# Altium PCB Sound_Board.PcbDoc
Units mil, origin at the board's own origin, x right, y up, seen from the top; angles counter-clockwise.
Board outline 1333.45 x 1141 mil, 2 copper layers (Top Layer, Bottom Layer), stack 57 mil thick; 6 components, 7 nets, 30 pads, 5 vias.
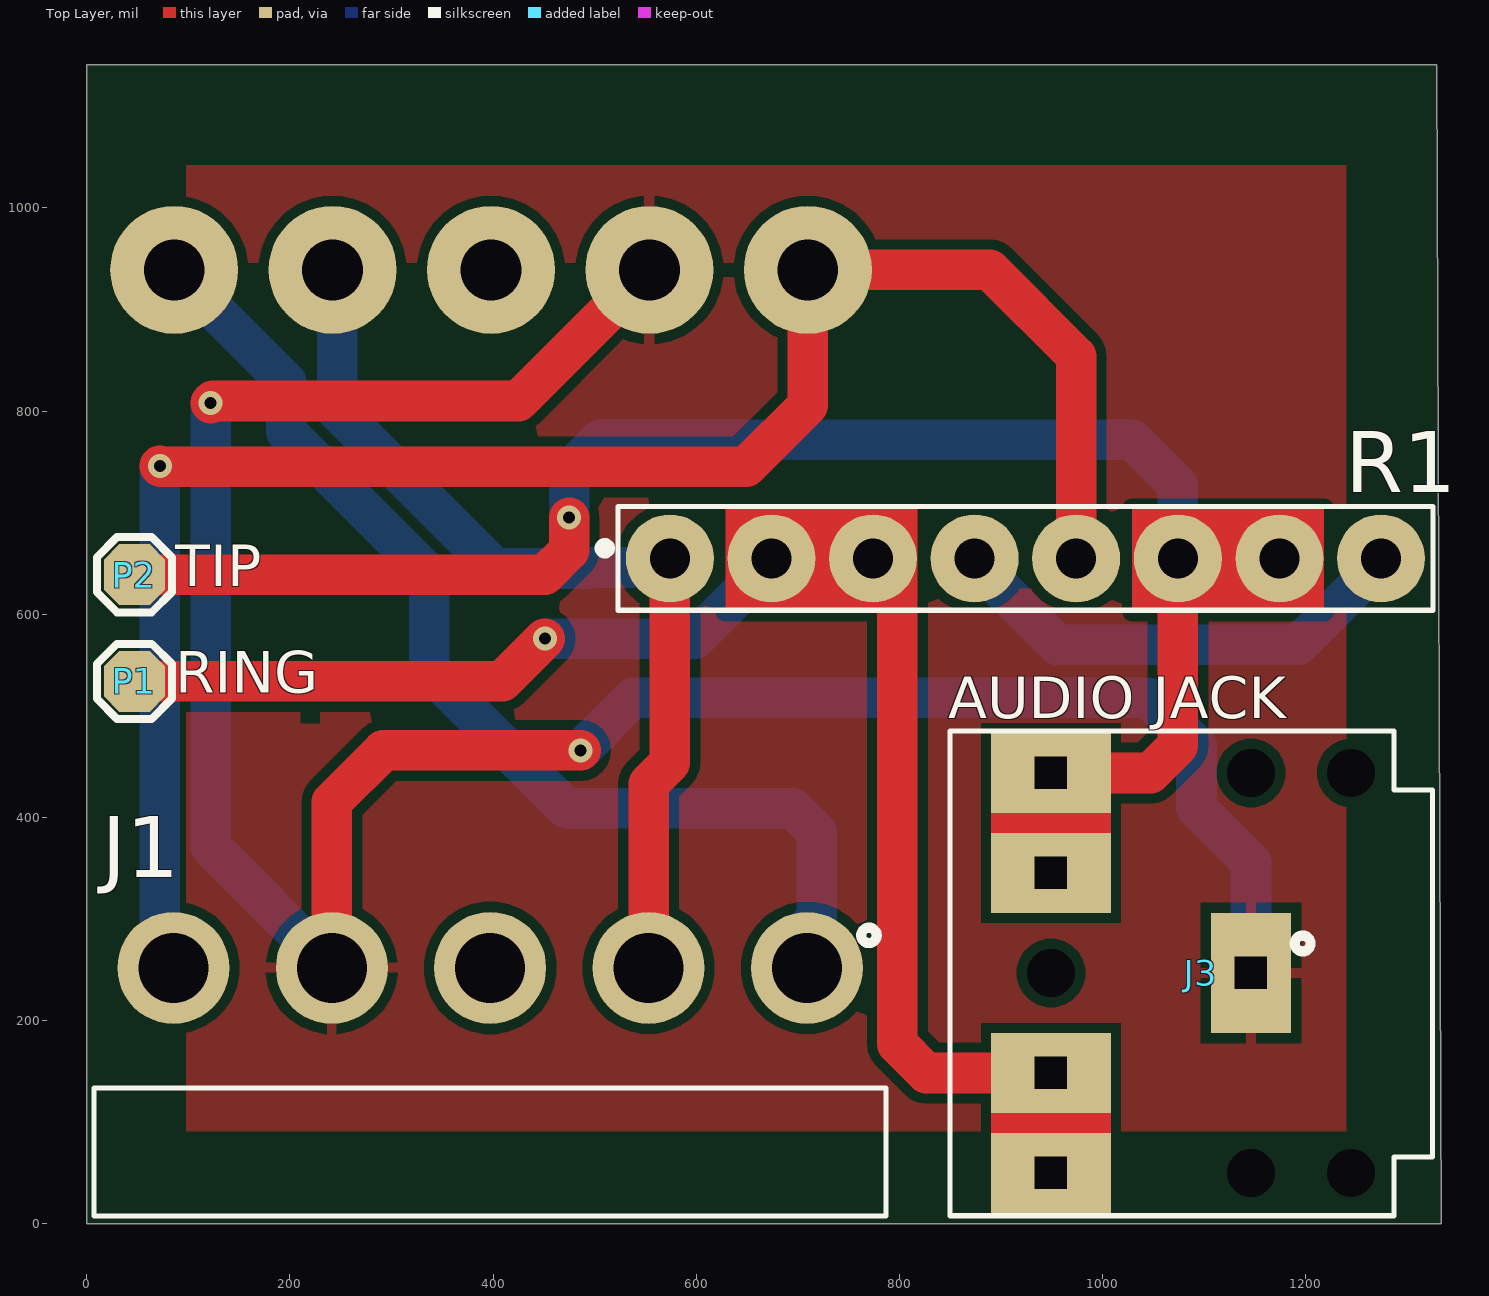
[diagram p0: Top Layer view]
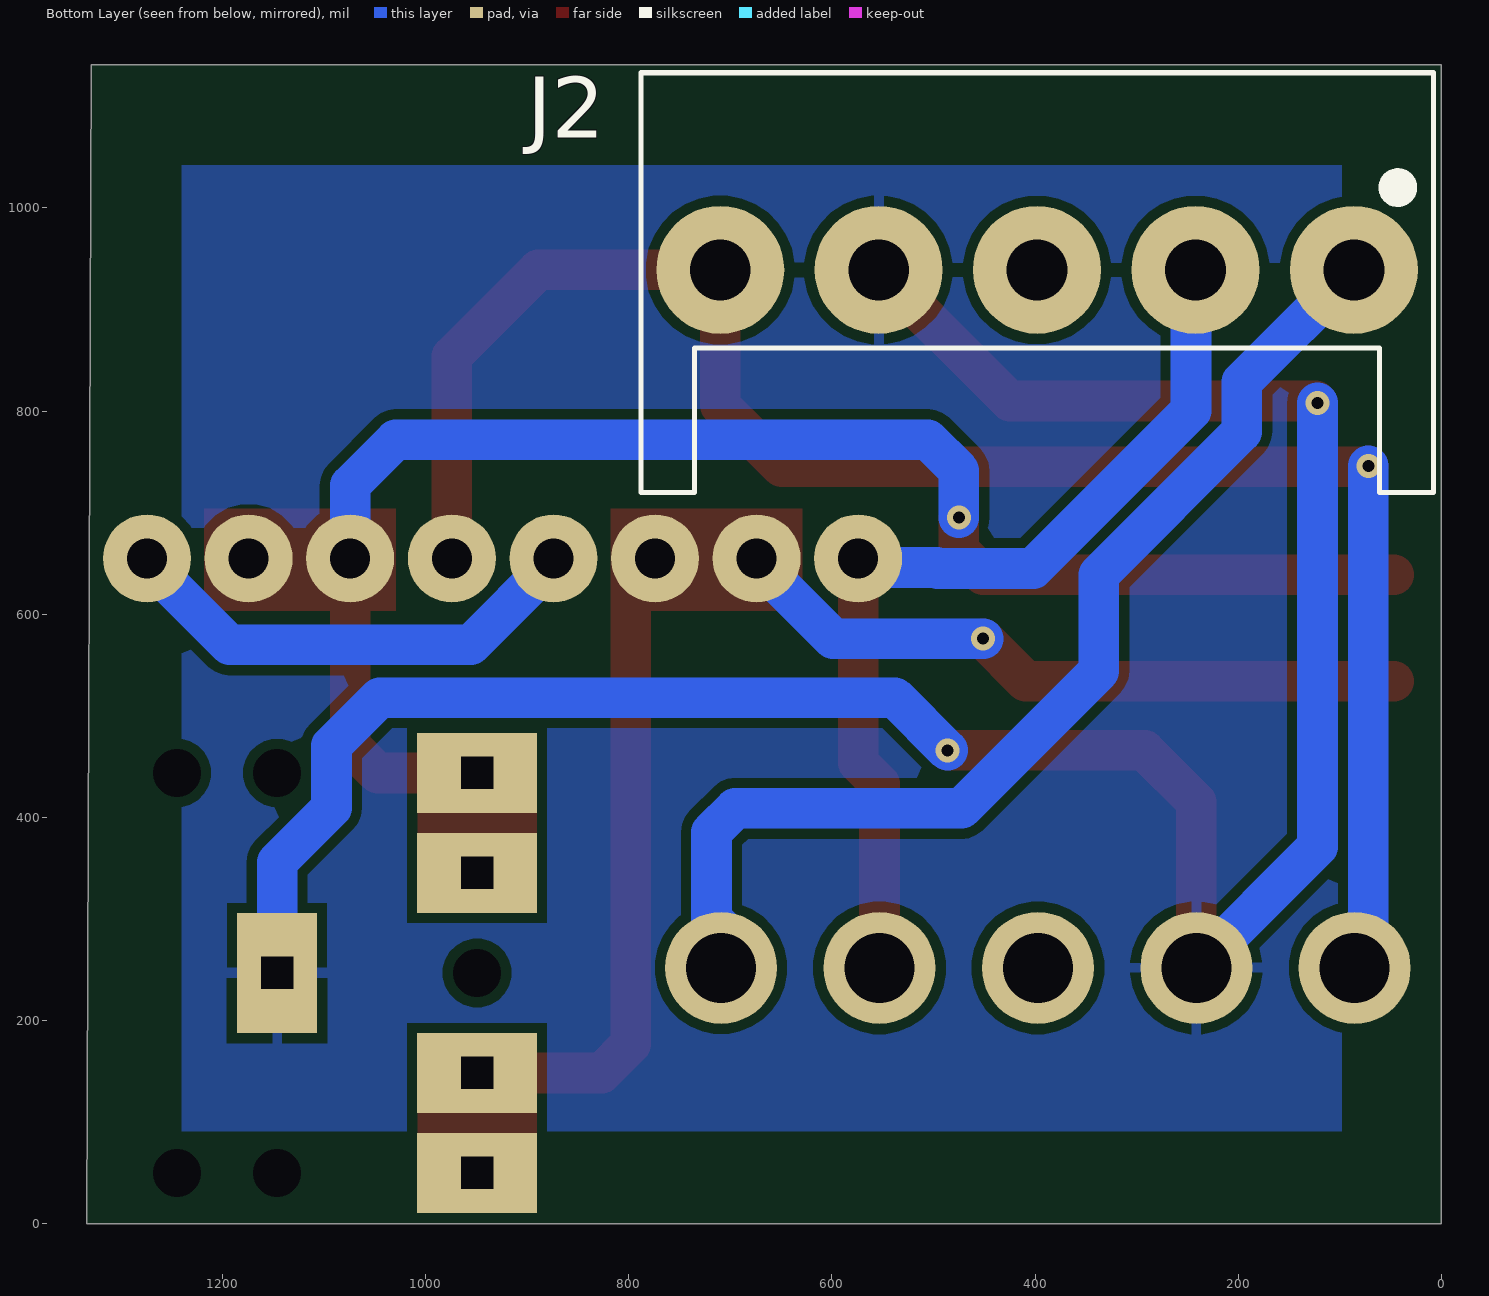
[diagram p1: Bottom Layer view, seen from below]

## Layer stack, top to bottom
Top Solder: solder mask 3, Solder Resist, Dk 3.5
Top Layer: signal copper 10
Dielectric 1: dielectric 37, FR-4, Dk 4.8
Bottom Layer: signal copper 10
Bottom Solder: solder mask 3, Solder Resist, Dk 3.5

## Board outline
0,0 0,1141 1329.09,1141 1333.45,0

## Design rules (kind name [scope] priority, off if disabled: settings)
Clearance [All] p1: gap=10 ignorepadtopadclearanceinfootprint=FALSE except(0: Arc-Hole Track-Hole SMDPad-Hole THPad-Hole Via-Hole Fill-Hole Poly-Hole Region-Hole Text-Hole)
HoleToHoleClearance [All] p1: gap=0 allowstackedmicrovias=TRUE
MinimumSolderMaskSliver [All] p1: minsoldermaskwidth=0
PolygonConnect [All] p1: connectstyle=Relief reliefconductorwidth=10 reliefentries=4 polygonreliefangle="90 Angle" airgapwidth=10
RoutingVias [All] p1: holewidth=11.81 width=23.62 viastyle="Through Hole" minholewidth=11.81 minwidth=23.62 maxholewidth=11.81 maxwidth=23.62
SilkToSilkClearance [All] p1: silktosilkclearance=0
SilkToSolderMaskClearance [IsPad] p1: minsilkscreentomaskgap=0 clearancetoexposedcopper=TRUE
SolderMaskExpansion [All] p1: expansion=4 istentingtop=FALSE
Width [All] p1: maxlimit=40 minlimit=10 preferedwidth=22
26 further rules are at their usual default settings.

## Components (designator, comment, footprint, x,y, rotation, side; value= is the part's Value field where it differs from the comment)
J1 "M3960R-05P" M3960R-05P 709,252 r180 top
J2 "0009484058" 0009484058 398,939 r0 bottom
J3 "PJ-307C" PJ-307C 1096.79,247 r180 top
P1 "Test Point" "TEST POINT" 47,534 r180 top
P2 "Test Point" "TEST POINT" 47,639 r0 top
R1 "220R" 4608X-102-221LF 924,655 r0 top

## Footprints (in the part's own frame and the unit in brackets; to place one, negate y for a bottom-side part, rotate by r counter-clockwise, add the part's x,y. Pads: shape width x height; smd on the part's side, far side on the other; paste and mask are expansions set on the pad)
4608X-102-221LF [mm]
  round 2.2 hole 1: 1(-8.89,0) 2(-6.35,0) 3(-3.81,0) 4(-1.27,0) 5(1.27,0) 6(3.81,0) 7(6.35,0) 8(8.89,0)
  silkscreen extent -10.64,-1.3 10.19,1.3, body extent -10.14,-1.24 10.14,1.25, height 4.35
0009484058 [mm]
  round 3.2 hole 1.52: 1(-7.92,0) 2(-3.96,0) 3(0,0) 4(3.96,0) 5(7.92,0)
  silkscreen extent -9.91,-4.93 9.91,5.56, body extent -9.86,-6.35 9.86,5.53, height 11.5
M3960R-05P [mm]
  round 2.8 hole 1.75: 1(0,0) 2(3.96,0) 3(7.92,0) 4(11.88,0) 5(15.84,0)
  silkscreen extent -1.98,-1.01 17.82,6.2
PJ-307C [mm]
  rect 2x3 hole 0.8 square: 1(-1.25,0)
  rect 3x2 hole 0.8 square: 2(3.75,5) 3(3.75,2.5) 4(3.75,-2.5) 5(3.75,-5)
  round 0 hole 1.2 unplated: MH1(-3.75,5) MH2(-1.25,5) MH3(-3.75,-5) MH4(-1.25,-5) MH5(3.75,0)
  silkscreen extent -5.79,-6.05 6.27,6.07, body extent -7.76,-5.98 6.24,6.02, height 6.01
"TEST POINT" [mil]
  oct 60x60 smd: 1(0,0)
  silkscreen extent -37,-37 37,37

## Part data
J1: "1x5P 1 3.96mm Male pin 5 Shrouded Plugin,P=3.96mm Wire To Board / Wire To Wire Connector ROHS", Manufacturer=XFCN, ComponentLink1Description=LCSC, ComponentLink1URL=https://www.lcsc.com/product-detail/Wire-To-Board-Wire-To-Wire-Connector_XFCN-M3960R-05P_C492523.html, Manufacturer Part No=M3960R-05P
J2: "CONN RCPT 5POS 0.156 TIN PCB", Manufacturer=Molex, Manufacturer Part Number=09-48-4058, Supplier Part Number 1=99AC9867, Category="Headers and Wire Housings", ComponentLink1Description=https://datasheet.ciiva.com/5152/0009484058-pcb-receptacles-156345-5152334.pdf?src-supplier=Mouser, ComponentLink1URL=https://datasheet.ciiva.com/5152/0009484058-pcb-receptacles-156345-5152334.pdf?src-supplier=Mouser, ComponentLink2Description=https://datasheet.ciiva.com/30162/135130009484058-pcb-receptacles-30162639.pdf?src-supplier=Onlinecomponents.com, ComponentLink2URL=https://datasheet.ciiva.com/30162/135130009484058-pcb-receptacles-30162639.pdf?src-supplier=Onlinecomponents.com, ComponentLink3Description=https://datasheet.ciiva.com/3935/54480009484058-pcb-receptacles-3935610.pdf?src-supplier=Arrow+Electronics, ComponentLink3URL=https://datasheet.ciiva.com/3935/54480009484058-pcb-receptacles-3935610.pdf?src-supplier=Arrow+Electronics, ComponentLink4Description=https://datasheet.ciiva.com/23692/ps-08-50-23692432.pdf?src-supplier=Newark, ComponentLink4URL=https://datasheet.ciiva.com/23692/ps-08-50-23692432.pdf?src-supplier=Newark, Pricing 1="1=1.40000, 10=1.14000, 25=1.08000, 50=1.02000, 100=0.95900, 250=0.91000 (USD)", RoHS=Yes, Stock 1=536, Supplier 1=Newark
J3: "3.5mm headphone jack 30V 500mA Plugin Audio Connectors ROHS", Manufacturer=BOOMELE, Package=Custom, ComponentLink1Description=LCSC, ComponentLink1URL=https://www.lcsc.com/product-detail/span-style-background-color-ff0-Audio-span-Connectors_BOOMELE-Boom-Precision-Elec-PJ-307C_C16684.html, Manufacturer Part No=PJ-307C
P1 P2: library part "TEST POINT", "Test Point ON"
R1: library part 4608X-102-221LF, "RES ARRAY 4 RES 220 OHM 8SIP", Case/Package=SIP, Insulation Resistance=10GR, Manufacturer=Bourns, Max Operating Temperature=125°C, Min Operating Temperature=-55°C, Number of Resistors=4, Package Quantity=200, Power Per Element=300mW, Power Rating=1W, Resistance Tolerance=2%, Supplier Part Number 1=5223882, Temperature Coefficient=100ppm/°C, Voltage Rating=100V, Category="Resistor Arrays", Circuit Type=Isolated, ComponentLink1Description=https://datasheet.ciiva.com/14179/ee4609x-14179600.pdf?src-supplier=Distrelec, ComponentLink1URL=https://datasheet.ciiva.com/14179/ee4609x-14179600.pdf?src-supplier=Distrelec, ComponentLink2Description=https://datasheet.ciiva.com/11807/0900766b8069ccfd-11807176.pdf?src-supplier=RSComponents, ComponentLink2URL=https://datasheet.ciiva.com/11807/0900766b8069ccfd-11807176.pdf?src-supplier=RSComponents, ComponentLink3Description=https://datasheet.ciiva.com/3263/4600x-3263657.pdf?src-supplier=Avnet, ComponentLink3URL=https://datasheet.ciiva.com/3263/4600x-3263657.pdf?src-supplier=Avnet, ComponentLink4Description=https://datasheet.ciiva.com/15158/getdatasheetpartid-201762-15158038.pdf?src-supplier=Verical, ComponentLink4URL=https://datasheet.ciiva.com/15158/getdatasheetpartid-201762-15158038.pdf?src-supplier=Verical, ComponentLink5Description=https://datasheet.ciiva.com/16827/4600x-16827721.pdf?src-supplier=Avnet+Europe, ComponentLink5URL=https://datasheet.ciiva.com/16827/4600x-16827721.pdf?src-supplier=Avnet+Europe, ComponentLink6Description=https://datasheet.ciiva.com/2690/4600x-2690298.pdf?src-supplier=Digi-Key, ComponentLink6URL=https://datasheet.ciiva.com/2690/4600x-2690298.pdf?src-supplier=Digi-Key, ComponentLink7Description=https://datasheet.ciiva.com/30208/4600x-30208038.pdf?src-supplier=Onlinecomponents.com, ComponentLink7URL=https://datasheet.ciiva.com/30208/4600x-30208038.pdf?src-supplier=Onlinecomponents.com, ComponentLink8Description=https://datasheet.ciiva.com/14583/70154307-14583677.pdf?src-supplier=Allied+Electronics, ComponentLink8URL=https://datasheet.ciiva.com/14583/70154307-14583677.pdf?src-supplier=Allied+Electronics, ComponentLink9Description=https://datasheet.ciiva.com/1133/682196-1133120.pdf?src-supplier=Element14, ComponentLink9URL=https://datasheet.ciiva.com/1133/682196-1133120.pdf?src-supplier=Element14, Depth=2.49mm, Height=0.2inch, Lead Free="Lead Free", Lead Length=3.43mm, Length=20.27mm, Manufacturer Part Number=4608X-102-221LF, Material=Resin,Epoxy, Military Standard=Not, Mount="Through Hole", Number of Contacts=8, Number of Elements=4, Number of Pins=8, Number of Terminals/Pins=8, Packaging=Bulk, Pricing 1="25=0.31900, 625=0.15300, 1250=0.13900, 2500=0.13200 (USD)", Radiation Hardening=No, REACH SVHC="No SVHC", Resistance=220R, RoHS=Yes, RoHS Compliant=Yes, Series=4600X, Stock 1=1, Supplier 1=RSComponents, Technology="THICK FILM", Terminal Pitch=2.54mm, Termination=Pin, Thickness=0.096inch, Tolerance=2%, Voltage Rating (DC)=100V, Width=0.098inch

## Via types
v1: diameter 23.62, hole 11.81, Top Layer to Bottom Layer, tented both sides, 5 vias

## Nets (pads, with @x,y where several pads share a name; then routed paths per layer and width w, separated by ;. In a path a pad name is that pad's centre, name@x,y a point inside that pad or via, vN(x,y) a via of type N, cw(c..) or ccw(c..) an arc to the next point about the centre after c; other vN are vias at no path point)
L+: J1.5 J2.5 R1.5 | length 1794.5
  Top Layer w40: v1(72,746) 72.92,745.08 649.08,745.08 709.81,805.81 J2.5 889,939 974,854 R1.5
  Bottom Layer w40: v1(72,746) 72,265.38 J1.5
L-: J1.4 J2.4 J3.1 | length 2414
  Top Layer w40: v1(122,808) 124,810 424.91,810 J2.4 ; J1.4 241.28,415.28 292.06,466.06 v1(486.06,466.06)
  Bottom Layer w40: v1(122,808) 122,371.28 J1.4 ; v1(486.06,466.06) 538,518 1045,518 1092.38,470.62 1092.38,409.62 1146,356 J3.1
NetR1_4: R1.4 R1.8 | length 464.2
  Bottom Layer w40: R1.4 874,651.33 955.33,570 1192.67,570 1269,646.33 R1.8@1269,646.57
R+: J1.2 J2.2 R1.1 | length 948
  Top Layer w40: J1.2 553.09,433.09 574,454 R1.1
  Bottom Layer w40: J2.2 246.52,934.58 246.52,800.48 401.92,645.08 495.71,645.08 496.71,646.08 565.08,646.08 R1.1
R-: J1.1 J2.1 | length 1087.3
  Bottom Layer w40: J2.1 196.52,828.67 196.52,779.77 337.19,639.1 337.19,544.23 472.42,409 695.02,409 718.45,385.57 718.45,300.65 691.81,274.01 J1.1@691.81,255
RING: J3.2 J3.3 P1.1 R1.2 R1.3 | length 1333.8
  Top Layer w40: P1.1 409,534 v1(451,576) ; R1.3 774,642.39 798,618.39 798,177 826.43,148.57 J3.3
  Bottom Layer w40: v1(451,576) 598.67,576 674,651.33 R1.2 R1.2@674,658.67
TIP: J3.4 J3.5 P2.1 R1.6 R1.7 | length 1538.7
  Top Layer w40: P2.1 451,639 475,663 v1(475,695.08) ; J3.5 1047.05,443.85 1074,470.8 R1.6
  Bottom Layer w40: v1(475,695.08) 475,741.4 505.43,771.84 1029.16,771.84 1074,727 R1.6
pads on no net: J1.3 J2.3 J3.MH1 J3.MH2 J3.MH3 J3.MH4 J3.MH5

## Polygon pours and split planes (outlines as drawn)
L- on Top Layer "Polygon_1" (solid, remove dead copper, pour order 3): 98,1042 98,91 1240,91 1240,1042 106,1042 105,1042
L- on Bottom Layer "Polygon_1" (solid, remove dead copper, pour order 2): 98,1042 98,91 1240,91 1240,1042 106,1042 105,1042

## Other copper
Top Layer:
  rectangle net TIP: 890,307.28 1008,482.28
  rectangle net TIP: 1029,603 1218,704
  rectangle net RING: 890,12 1008,187
  rectangle net RING: 629,603 818,704

## Silkscreen, mask and mechanical layers (free items; w line width, h text height)
Top Overlay:
  text "TIP" at 87,614 h70
  text "RING" at 87,509 h70
  text "AUDIO JACK" at 848,484 h70
Mechanical 2:
  the board outline again, w10

## Dimensions
1329.09,1141 to 1333.45,0 on Mechanical 1
0,1141 to 1329.09,1141 on Mechanical 1